# Altium PCB NB2DSK01.PcbDoc (part 8 of 17)
Units mil, origin at the board's own origin, x right, y up, seen from the top; angles counter-clockwise.
Board outline 11815 x 6500.03 mil, 8 copper layers (Top Layer, MidLayer1, MidLayer2, GND, PWR, MidLayer3, MidLayer4, Bottom Layer), stack 74.62 mil thick; 798 components, 1002 nets, 3927 pads, 3182 vias.
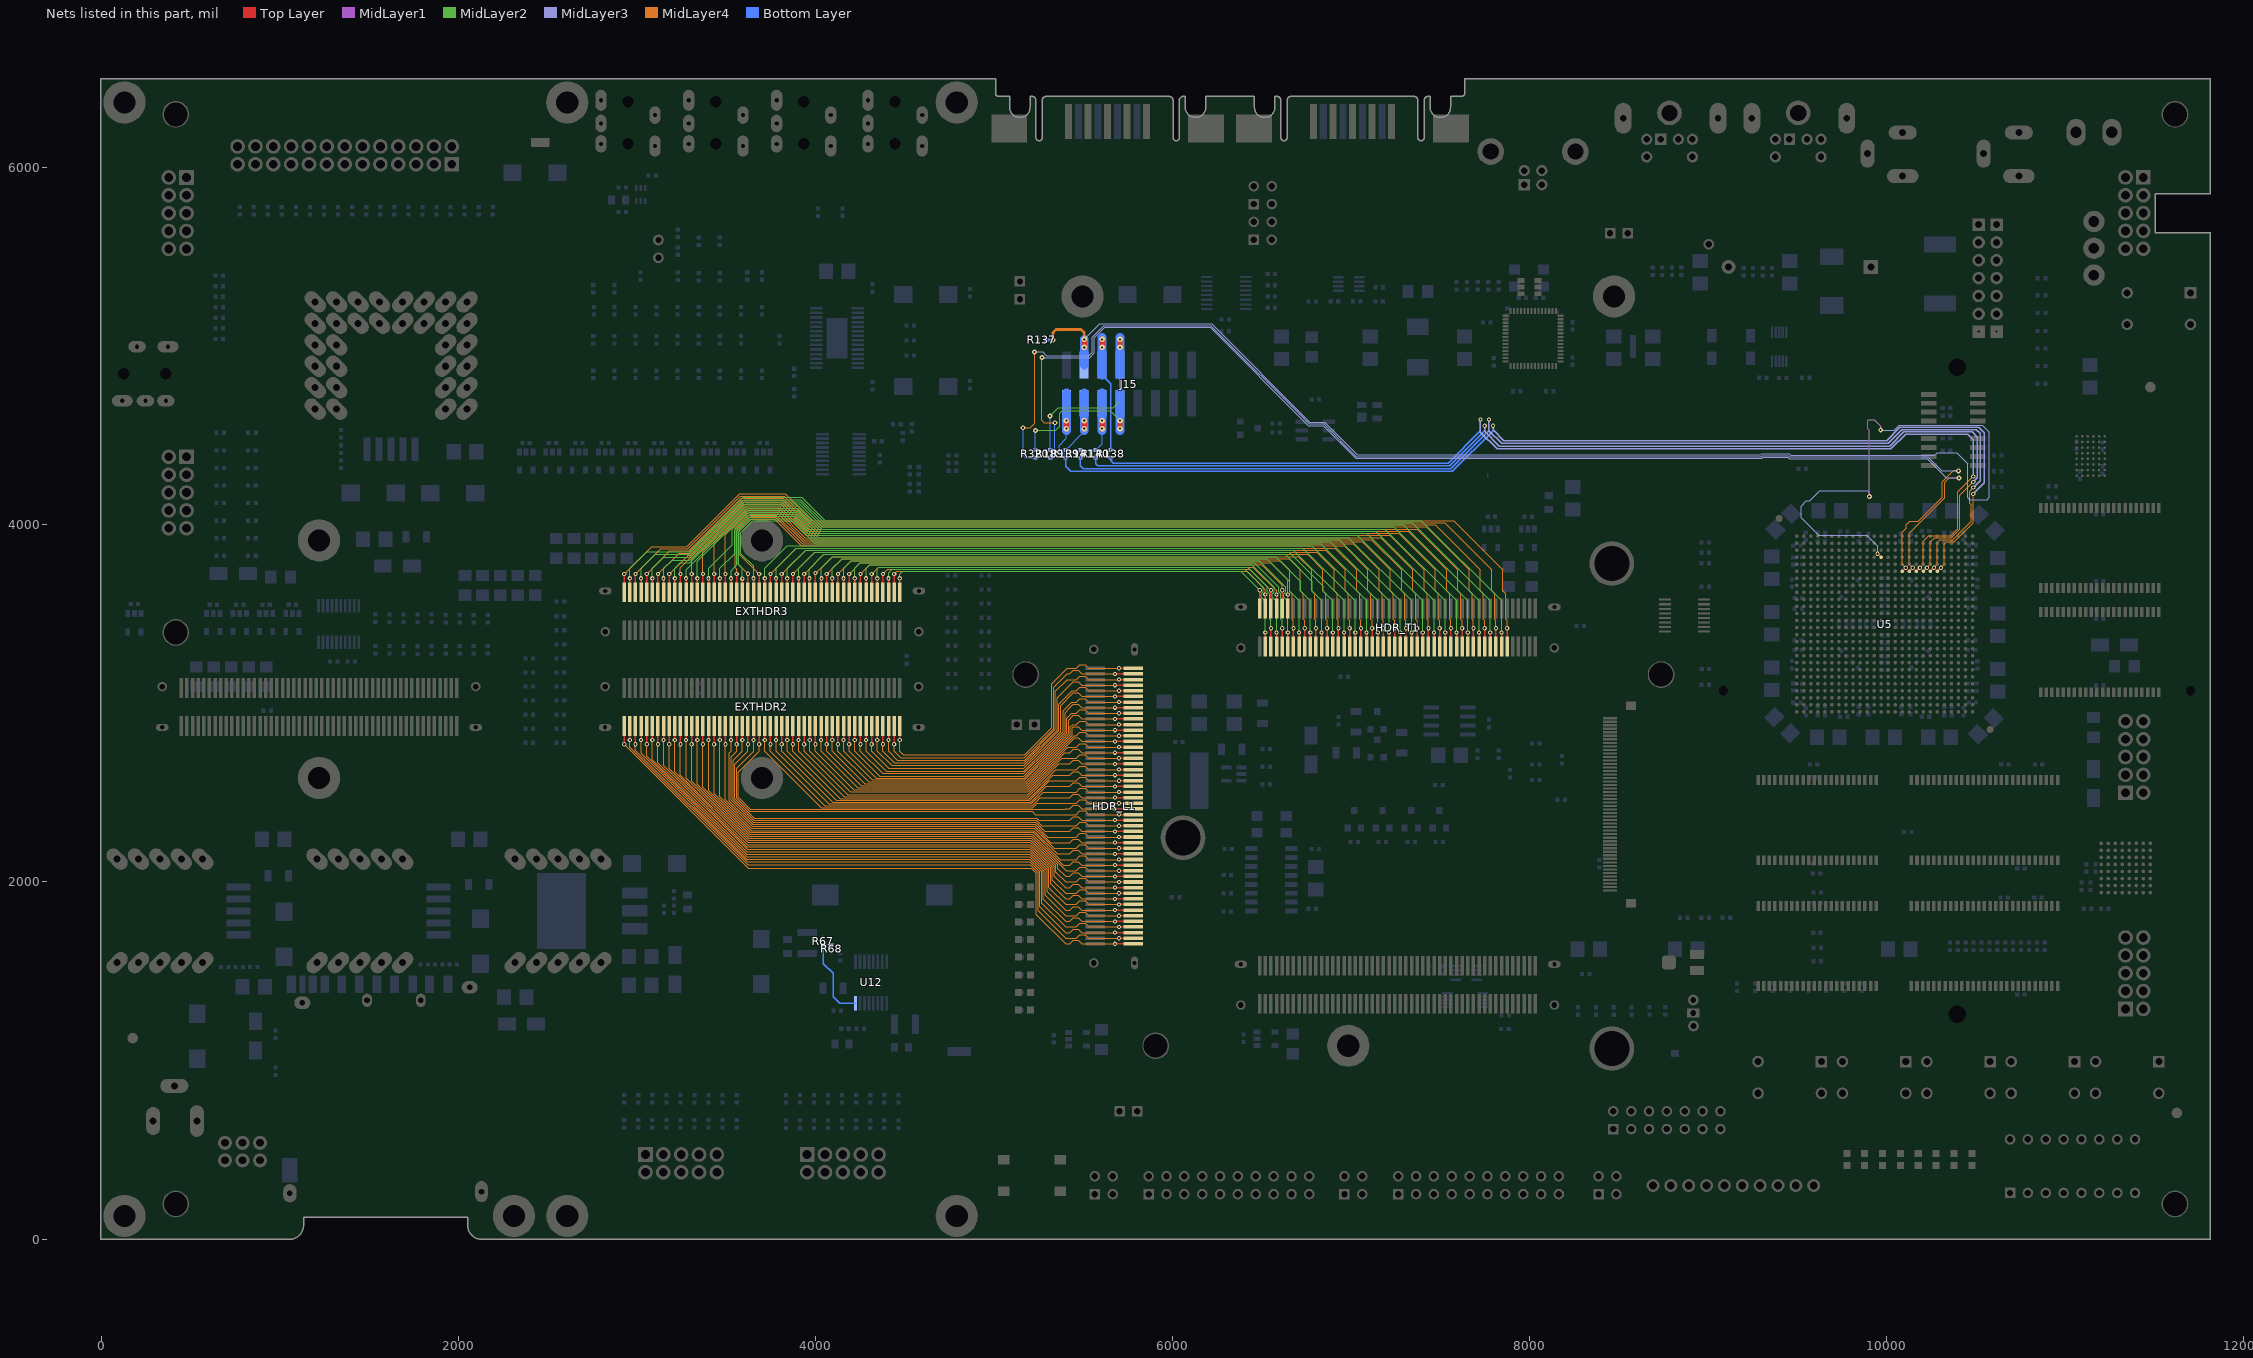
[diagram p14: the nets of this part, all layers, seen from the top]

## Via types
v1: diameter 23.62, hole 11.81, Top Layer to Bottom Layer, tented both sides, 1950 vias
v2: diameter 27.56, hole 11.81, Top Layer to Bottom Layer, tented both sides, 679 vias
v3: diameter 23.62, hole 11.81, Top Layer to Bottom Layer, 194 vias
v4: diameter 31.5, hole 11.81, Top Layer to Bottom Layer, tented both sides, 178 vias
v5: diameter 21.65, hole 11.81, Top Layer to Bottom Layer, tented both sides, 67 vias
v6: diameter 23.62, hole 11.81, Top Layer to Bottom Layer, tented bottom, 53 vias
v7: diameter 26, hole 11.81, Top Layer to Bottom Layer, tented both sides, 21 vias
v8: diameter 26, hole 11.81, Top Layer to Bottom Layer, 13 vias
v9: diameter 28, hole 11.81, Top Layer to Bottom Layer, 8 vias
v10: diameter 25.59, hole 11.81, Top Layer to Bottom Layer, tented both sides, 7 vias
v11: diameter 39.37, hole 11.81, Top Layer to Bottom Layer, tented both sides, 5 vias
v12: diameter 30, hole 11.81, Top Layer to Bottom Layer, 3 vias
v13: diameter 30, hole 11.81, Top Layer to Bottom Layer, tented both sides, 2 vias
v14: diameter 23, hole 11.81, Top Layer to Bottom Layer, tented both sides, 1 vias
v15: diameter 26.56, hole 11.81, Top Layer to Bottom Layer, tented both sides, 1 vias

## Nets (pads, with @x,y where several pads share a name; then routed paths per layer and width w, separated by ;. In a path a pad name is that pad's centre, name@x,y a point inside that pad or via, vN(x,y) a via of type N, cw(c..) or ccw(c..) an arc to the next point about the centre after c; other vN are vias at no path point) (continued)
EXT_B.D0: EXTHDR2.2 HDR_L1.2 | length 1820.1
  Top Layer w7.87: v1(4472.44,2795.28) EXTHDR2.2@4472.44,2874.02 ; v1(5700.79,3196.85) HDR_L1.2@5779.53,3196.85
  MidLayer4 w5: v1(4472.44,2795.28) 4472.44,2732.28 4493.27,2711.45 5172.08,2711.45 5323.67,2863.04 5323.67,3111.07 5409.45,3196.85 5460.63,3196.85 5480.32,3216.54 5511.81,3216.54 5531.5,3196.85 v1(5700.79,3196.85)
EXT_B.D1: EXTHDR2.4 HDR_L1.4 | length 1841.6
  Top Layer w7.87: v1(4440.95,2771.65) EXTHDR2.4@4440.95,2874.02 ; v1(5677.16,3165.36) HDR_L1.4@5779.53,3165.36
  MidLayer4 w5: v1(4440.95,2771.65) 4440.95,2732.28 4477.78,2695.45 5170.23,2695.45 5238.27,2763.5 5333.67,2858.89 5333.67,3089.57 5409.45,3165.35 5425.2,3165.35 5444.88,3185.04 5472.44,3185.04 5492.13,3165.36 v1(5677.16,3165.36)
EXT_B.D2: EXTHDR2.6 HDR_L1.6 | length 1860.7
  Top Layer w7.87: v1(4409.45,2795.28) EXTHDR2.6@4409.45,2874.02 ; v1(5700.79,3133.86) HDR_L1.6@5779.53,3133.86
  MidLayer4 w5: v1(4409.45,2795.28) 4409.45,2732.28 4459.28,2682.45 5171.37,2682.45 5343.67,2854.75 5343.67,3068.08 5409.45,3133.86 5460.63,3133.86 5480.32,3153.54 5511.81,3153.54 5531.5,3133.86 v1(5700.79,3133.86)
EXT_B.D3: EXTHDR2.8 HDR_L1.8 | length 1872.2
  Top Layer w7.87: v1(4377.95,2771.65) EXTHDR2.8@4377.95,2874.02 ; v1(5677.16,3102.36) HDR_L1.8@5779.53,3102.36
  MidLayer4 w5: v1(4377.95,2771.65) 4377.95,2732.28 4442.78,2667.45 5170.51,2667.45 5353.67,2850.61 5353.67,3030.83 5425.2,3102.36 5444.88,3122.05 5472.44,3122.05 5492.13,3102.36 v1(5677.16,3102.36)
EXT_B.D4: EXTHDR2.10 HDR_L1.10 | length 1884.8
  Top Layer w7.87: v1(4346.46,2795.28) EXTHDR2.10@4346.46,2874.02 ; v1(5700.79,3070.87) HDR_L1.10@5779.53,3070.87
  MidLayer4 w5: v1(4346.46,2795.28) 4346.46,2732.28 4426.29,2652.45 5169.65,2652.45 5268.27,2751.07 5363.67,2846.47 5363.67,2995.53 5439,3070.87 5460.63,3070.87 5480.32,3090.55 5511.81,3090.55 5531.5,3070.87 v1(5700.79,3070.87)
EXT_B.D5: EXTHDR2.12 HDR_L1.12 | length 1914.4
  Top Layer w7.87: v1(4314.96,2771.65) EXTHDR2.12@4314.96,2874.02 ; v1(5677.16,3039.37) HDR_L1.12@5779.53,3039.37
  MidLayer4 w5: v1(4314.96,2771.65) 4314.96,2732.28 4410.79,2636.45 5167.79,2636.45 5373.67,2842.33 5373.67,2987.84 5444.88,3059.06 5472.44,3059.06 5492.13,3039.37 v1(5677.16,3039.37)
EXT_B.D6: EXTHDR2.14 HDR_L1.14 | length 1929.6
  Top Layer w7.87: v1(4283.47,2795.28) EXTHDR2.14@4283.47,2874.02 ; v1(5700.79,3007.88) HDR_L1.14@5779.53,3007.88
  MidLayer4 w5: v1(4283.47,2795.28) 4283.47,2732.28 4395.3,2620.45 5165.94,2620.45 5387.81,2842.33 5387.81,2959.68 5436,3007.88 5460.63,3007.88 5480.32,3027.56 5511.81,3027.56 5531.5,3007.88 v1(5700.79,3007.88)
EXT_B.D7: EXTHDR2.16 HDR_L1.16 | length 1954.2
  Top Layer w7.87: v1(4251.97,2771.65) EXTHDR2.16@4251.97,2874.02 ; v1(5677.16,2976.38) HDR_L1.16@5779.53,2976.38
  MidLayer4 w5: v1(4251.97,2771.65) 4251.97,2732.28 4375.8,2608.45 5168.08,2608.45 5298.27,2738.64 5397.81,2838.18 5397.81,2948.99 5425.2,2976.38 5444.88,2996.06 5472.44,2996.06 5492.13,2976.38 v1(5677.16,2976.38)
EXT_B.D8: EXTHDR2.18 HDR_L1.18 | length 1969.2
  Top Layer w7.87: v1(4220.47,2795.28) EXTHDR2.18@4220.47,2874.02 ; v1(5700.79,2944.88) HDR_L1.18@5779.53,2944.88
  MidLayer4 w5: v1(4220.47,2795.28) 4220.47,2732.28 4359.3,2593.45 5167.22,2593.45 5407.81,2834.04 5407.81,2917.69 5435,2944.88 5460.63,2944.88 5480.32,2964.57 5511.81,2964.57 5531.5,2944.88 v1(5700.79,2944.88)
EXT_B.D9: EXTHDR2.20 HDR_L1.20 | length 1993.1
  Top Layer w7.87: v1(4188.98,2771.65) EXTHDR2.20@4188.98,2874.02 ; v1(5677.16,2913.39) HDR_L1.20@5779.53,2913.39
  MidLayer4 w5: v1(4188.98,2771.65) 4188.98,2732.28 4339.81,2581.45 5169.36,2581.45 5417.81,2829.9 5417.81,2906 5444.88,2933.07 5472.44,2933.07 5492.13,2913.39 v1(5677.16,2913.39)
EXT_B.D10: EXTHDR2.22 HDR_L1.22 | length 2000.4
  Top Layer w7.87: v1(4157.48,2795.28) EXTHDR2.22@4157.48,2874.02 ; v1(5700.79,2881.89) HDR_L1.22@5779.53,2881.89
  MidLayer4 w5: v1(4157.48,2795.28) 4157.48,2732.28 4318.31,2571.45 5173.51,2571.45 5328.27,2726.22 5427.81,2825.76 5427.81,2868.7 5441,2881.89 5460.63,2881.89 5480.32,2901.58 5511.81,2901.58 5531.5,2881.89 v1(5700.79,2881.89)
EXT_B.D11: EXTHDR2.24 HDR_L1.24 | length 2027.1
  Top Layer w7.87: v1(4125.99,2771.65) EXTHDR2.24@4125.98,2874.02 ; v1(5677.16,2850.4) HDR_L1.24@5779.53,2850.39
  MidLayer4 w5: v1(4125.99,2771.65) 4125.99,2732.28 4297.82,2560.45 5176.65,2560.45 5437.81,2821.62 5437.81,2863.01 5444.88,2870.08 5472.44,2870.08 5492.13,2850.4 v1(5677.16,2850.4)
EXT_B.D12: EXTHDR2.26 HDR_L1.26 | length 2030.4
  Top Layer w7.87: v1(4094.49,2795.28) EXTHDR2.26@4094.49,2874.02 ; v1(5700.79,2818.9) HDR_L1.26@5779.53,2818.9
  MidLayer4 w5: v1(4094.49,2795.28) 4094.49,2732.28 4277.32,2549.45 5179.79,2549.45 5348.27,2717.93 5449.23,2818.9 5460.63,2818.9 5480.32,2838.58 5511.81,2838.58 5531.5,2818.9 v1(5700.79,2818.9)
EXT_B.D13: EXTHDR2.28 HDR_L1.28 | length 2057.2
  Top Layer w7.87: v1(4062.99,2771.65) EXTHDR2.28@4062.99,2874.02 ; v1(5677.16,2787.4) HDR_L1.28@5779.53,2787.4
  MidLayer4 w5: v1(4062.99,2771.65) 4062.99,2732.28 4255.82,2539.45 5183.93,2539.45 5358.27,2713.79 ; 5358.27,2713.79 5451.57,2807.09 5472.44,2807.09 5492.13,2787.4 v1(5677.16,2787.4)
EXT_B.D14: EXTHDR2.30 HDR_L1.30 | length 2085.5
  Top Layer w7.87: v1(4031.5,2795.28) EXTHDR2.30@4031.5,2874.02 ; v1(5700.79,2755.91) HDR_L1.30@5779.53,2755.91
  MidLayer4 w5: v1(4031.5,2795.28) 4031.5,2732.28 4236.33,2527.45 5186.07,2527.45 5414.53,2755.91 5460.63,2755.91 5480.32,2775.59 5511.81,2775.59 5531.5,2755.91 v1(5700.79,2755.91)
EXT_B.D15: EXTHDR2.32 HDR_L1.32 | length 2113.1
  Top Layer w7.87: v1(4000,2771.65) EXTHDR2.32@4000,2874.02 ; v1(5677.16,2724.41) HDR_L1.32@5779.53,2724.41
  MidLayer4 w5: v1(4000,2771.65) 4000,2732.28 4215.83,2516.45 5189.22,2516.45 5397.17,2724.41 5425.2,2724.41 5444.88,2744.1 5472.44,2744.1 5492.13,2724.41 v1(5677.16,2724.41)
EXT_B.D16: EXTHDR2.34 HDR_L1.34 | length 2141.5
  Top Layer w7.87: v1(3968.51,2795.28) EXTHDR2.34@3968.5,2874.02 ; v1(5700.79,2692.91) HDR_L1.34@5779.53,2692.91
  MidLayer4 w5: v1(3968.51,2795.28) 3968.51,2732.28 4196.33,2504.45 5191.36,2504.45 5379.82,2692.91 5460.63,2692.91 5480.32,2712.6 5511.81,2712.6 5531.5,2692.91 v1(5700.79,2692.91)
EXT_B.D17: EXTHDR2.36 HDR_L1.36 | length 2174
  Top Layer w7.87: v1(3937.01,2771.65) EXTHDR2.36@3937.01,2874.02 ; v1(5677.16,2661.42) HDR_L1.36@5779.53,2661.42
  MidLayer4 w5: v1(3937.01,2771.65) 3937.01,2732.28 4181.81,2487.48 5188.53,2487.48 5362.47,2661.42 5425.2,2661.42 5444.88,2681.1 5472.44,2681.1 5492.13,2661.42 v1(5677.16,2661.42)
EXT_B.D18: EXTHDR2.38 HDR_L1.38 | length 2200.7
  Top Layer w7.87: v1(3905.51,2795.28) EXTHDR2.38@3905.51,2874.02 ; v1(5700.79,2629.92) HDR_L1.38@5779.53,2629.92
  MidLayer4 w5: v1(3905.51,2795.28) 3905.51,2732.28 4160.32,2477.48 5192.67,2477.48 5345.11,2629.92 5460.63,2629.92 5480.32,2649.61 5511.81,2649.61 5531.5,2629.92 v1(5700.79,2629.92)
EXT_B.D19: EXTHDR2.40 HDR_L1.40 | length 2227.5
  Top Layer w7.87: v1(3874.02,2771.65) EXTHDR2.40@3874.02,2874.02 ; v1(5677.16,2598.43) HDR_L1.40@5779.53,2598.43
  MidLayer4 w5: v1(3874.02,2771.65) 3874.02,2732.28 4138.82,2467.48 5196.81,2467.48 5327.76,2598.43 5425.2,2598.43 5444.88,2618.11 5472.44,2618.11 5492.13,2598.43 v1(5677.16,2598.43)
EXT_B.D20: EXTHDR2.42 HDR_L1.42 | length 2254.2
  Top Layer w7.87: v1(3842.52,2795.28) EXTHDR2.42@3842.52,2874.02 ; v1(5700.79,2566.93) HDR_L1.42@5779.53,2566.93
  MidLayer4 w5: v1(3842.52,2795.28) 3842.52,2732.28 4117.32,2457.48 5200.95,2457.48 5310.4,2566.93 5460.63,2566.93 5480.32,2586.61 5511.81,2586.61 5531.5,2566.93 v1(5700.79,2566.93)
EXT_B.D21: EXTHDR2.44 HDR_L1.44 | length 2280.9
  Top Layer w7.87: v1(3811.02,2771.65) EXTHDR2.44@3811.02,2874.02 ; v1(5677.16,2535.43) HDR_L1.44@5779.53,2535.43
  MidLayer4 w5: v1(3811.02,2771.65) 3811.02,2732.28 4095.83,2447.48 5205.1,2447.48 5293.05,2535.43 5425.2,2535.43 5444.88,2555.12 5472.44,2555.12 5492.13,2535.43 v1(5677.16,2535.43)
EXT_B.D22: EXTHDR2.46 HDR_L1.46 | length 2307.7
  Top Layer w7.87: v1(3779.53,2795.28) EXTHDR2.46@3779.53,2874.02 ; v1(5700.79,2503.94) HDR_L1.46@5779.53,2503.94
  MidLayer4 w5: v1(3779.53,2795.28) 3779.53,2732.28 4074.33,2437.48 5209.24,2437.48 5275.7,2503.94 5460.63,2503.94 5480.32,2523.62 5511.81,2523.62 5531.5,2503.94 v1(5700.79,2503.94)
EXT_B.D23: EXTHDR2.48 HDR_L1.48 | length 2334.4
  Top Layer w7.87: v1(3748.03,2771.65) EXTHDR2.48@3748.03,2874.02 ; v1(5677.16,2472.44) HDR_L1.48@5779.53,2472.44
  MidLayer4 w5: v1(3748.03,2771.65) 3748.03,2732.28 4052.83,2427.48 5213.38,2427.48 5258.34,2472.44 5425.2,2472.44 5444.88,2492.13 5472.44,2492.13 5492.13,2472.44 v1(5677.16,2472.44)
EXT_B.D24: EXTHDR2.50 HDR_L1.50 | length 2361.6
  Top Layer w7.87: v1(3716.54,2795.28) EXTHDR2.50@3716.54,2874.02 ; v1(5700.79,2440.95) HDR_L1.50@5779.53,2440.95
  MidLayer4 w5: v1(3716.54,2795.28) 3716.54,2732.28 4031.89,2416.93 5216.97,2416.93 5240.99,2440.95 5460.63,2440.95 5480.32,2460.63 5511.81,2460.63 5531.5,2440.95 v1(5700.79,2440.95)
EXT_B.D25: EXTHDR2.52 HDR_L1.52 | length 2704.6
  Top Layer w7.87: v1(3685.04,2771.65) EXTHDR2.52@3685.04,2874.02 ; v1(5677.16,2409.45) HDR_L1.52@5779.53,2409.45
  MidLayer4 w5: v1(3685.04,2771.65) 3685.04,2732.28 3568.74,2615.98 3568.74,2473.69 3635.81,2406.62 5398.74,2406.62 5401.58,2409.45 5425.2,2409.45 5444.88,2429.13 5472.44,2429.13 5492.13,2409.45 v1(5677.16,2409.45)
EXT_B.D26: EXTHDR2.54 HDR_L1.54 | length 2718.8
  Top Layer w7.87: v1(3653.54,2795.28) EXTHDR2.54@3653.54,2874.02 ; v1(5700.79,2377.95) HDR_L1.54@5779.53,2377.95
  MidLayer4 w5: v1(3653.54,2795.28) 3653.54,2732.28 3558.74,2637.48 3558.74,2469.55 3631.67,2396.61 5213.62,2396.61 5232.28,2377.95 5460.63,2377.95 5480.32,2397.64 5511.81,2397.64 5531.5,2377.95 v1(5700.79,2377.95)
EXT_B.D27: EXTHDR2.56 HDR_L1.56 | length 2735.3
  Top Layer w7.87: v1(3622.05,2771.65) EXTHDR2.56@3622.05,2874.02 ; v1(5677.16,2346.46) HDR_L1.56@5779.53,2346.46
  MidLayer4 w5: v1(3622.05,2771.65) 3622.05,2732.28 3548.74,2658.98 3548.74,2465.4 3656.98,2357.16 5238.93,2357.16 5249.64,2346.46 5425.2,2346.46 5444.88,2366.14 5472.44,2366.14 5492.13,2346.46 v1(5677.16,2346.46)
EXT_B.D28: EXTHDR2.58 HDR_L1.58 | length 2751.9
  Top Layer w7.87: v1(3590.55,2795.28) EXTHDR2.58@3590.55,2874.02 ; v1(5700.79,2314.96) HDR_L1.58@5779.53,2314.96
  MidLayer4 w5: v1(3590.55,2795.28) 3590.55,2732.28 3538.74,2680.47 3538.74,2461.26 3655.55,2344.45 5237.5,2344.45 5266.99,2314.96 5460.63,2314.96 5480.32,2334.65 5511.81,2334.65 5531.5,2314.96 v1(5700.79,2314.96)
EXT_B.D29: EXTHDR2.60 HDR_L1.60 | length 2768.5
  Top Layer w7.87: v1(3559.06,2771.65) EXTHDR2.60@3559.06,2874.02 ; v1(5677.16,2283.47) HDR_L1.60@5779.53,2283.47
  MidLayer4 w5: v1(3559.06,2771.65) 3559.06,2732.28 3528.74,2701.97 3528.74,2457.12 3652.4,2333.45 5234.36,2333.45 5284.35,2283.47 5425.2,2283.47 5444.88,2303.15 5472.44,2303.15 5492.13,2283.47 v1(5677.16,2283.47)
EXT_B.D30: EXTHDR2.62 HDR_L1.62 | length 2785
  Top Layer w7.09: v1(3527.56,2795.28) EXTHDR2.62@3527.56,2874.02 ; v1(5700.79,2251.97) HDR_L1.62@5779.53,2251.97
  MidLayer4 w5: v1(3527.56,2795.28) 3527.56,2732.28 3518.74,2723.46 3518.74,2452.98 3649.26,2322.45 5231.22,2322.45 5301.7,2251.97 5460.63,2251.97 5480.32,2271.65 5511.81,2271.65 5531.5,2251.97 v1(5700.79,2251.97)
EXT_B.D31: EXTHDR2.64 HDR_L1.64 | length 2812.1
  Top Layer w7.09: v1(3496.06,2771.65) EXTHDR2.64@3496.06,2874.02 ; v1(5677.16,2220.47) HDR_L1.64@5779.53,2220.47
  MidLayer4 w5: v1(3496.06,2771.65) 3496.06,2461.51 3645.12,2312.45 5227.07,2312.45 5319.05,2220.47 5425.2,2220.47 5444.88,2240.16 5472.44,2240.16 5492.13,2220.47 v1(5677.16,2220.47)
EXT_B.D32: EXTHDR2.66 HDR_L1.66 | length 2847.4
  Top Layer w7.09: v1(3464.57,2795.28) EXTHDR2.66@3464.57,2874.02 ; v1(5700.79,2188.98) HDR_L1.66@5779.53,2188.98
  MidLayer4 w5: v1(3464.57,2795.28) 3464.57,2477.26 3641.37,2300.45 5224.93,2300.45 5336.41,2188.98 5460.63,2188.98 5480.32,2208.66 5511.81,2208.66 5531.5,2188.98 v1(5700.79,2188.98)
EXT_B.D33: EXTHDR2.68 HDR_L1.68 | length 2881.8
  Top Layer w7.09: v1(3433.07,2771.65) EXTHDR2.68@3433.07,2874.02 ; v1(5677.16,2157.48) HDR_L1.68@5779.53,2157.48
  MidLayer4 w5: v1(3433.07,2771.65) 3433.07,2494.61 3639.52,2288.16 5223.08,2288.16 5353.76,2157.48 5425.2,2157.48 5444.88,2177.17 5472.44,2177.17 5492.13,2157.48 v1(5677.16,2157.48)
EXT_B.D34: EXTHDR2.70 HDR_L1.70 | length 2916.2
  Top Layer w7.09: v1(3401.58,2795.28) EXTHDR2.70@3401.57,2874.02 ; v1(5700.79,2125.99) HDR_L1.70@5779.53,2125.98
  MidLayer4 w5: v1(3401.58,2795.28) 3401.58,2511.97 3635.84,2277.71 5219.39,2277.71 5371.12,2125.99 5460.63,2125.99 5480.32,2145.67 5511.81,2145.67 5531.5,2125.99 v1(5700.79,2125.99)
EXT_B.D35: EXTHDR2.72 HDR_L1.72 | length 2950.6
  Top Layer w7.09: v1(3370.08,2771.65) EXTHDR2.72@3370.08,2874.02 ; v1(5677.16,2094.49) HDR_L1.72@5779.53,2094.49
  MidLayer4 w5: v1(3370.08,2771.65) 3370.08,2529.32 3631.94,2267.45 5215.5,2267.45 5388.47,2094.49 5425.2,2094.49 5444.88,2114.17 5472.44,2114.17 5492.13,2094.49 v1(5677.16,2094.49)
EXT_B.D36: EXTHDR2.74 HDR_L1.74 | length 2984.9
  Top Layer w7.09: v1(3338.58,2795.28) EXTHDR2.74@3338.58,2874.02 ; v1(5700.79,2062.99) HDR_L1.74@5779.53,2062.99
  MidLayer4 w5: v1(3338.58,2795.28) 3338.58,2546.67 3628.8,2256.45 5212.36,2256.45 5405.82,2062.99 5460.63,2062.99 5480.32,2082.68 5511.81,2082.68 5531.5,2062.99 v1(5700.79,2062.99)
EXT_B.D37: EXTHDR2.76 HDR_L1.76 | length 3032.5
  Top Layer w7.09: v1(3307.09,2771.65) EXTHDR2.76@3307.09,2874.02 ; v1(5677.16,2031.5) HDR_L1.76@5779.53,2031.5
  MidLayer4 w5: v1(3307.09,2771.65) 3307.09,2564.03 3625.66,2245.45 5209.22,2245.45 5357.13,2097.55 5357.13,2075.12 5400.75,2031.5 5425.2,2031.5 5444.88,2051.18 5472.44,2051.18 5492.13,2031.5 v1(5677.16,2031.5)
EXT_B.D38: EXTHDR2.78 HDR_L1.78 | length 3077
  Top Layer w7.09: v1(3275.59,2795.28) EXTHDR2.78@3275.59,2874.02 ; v1(5700.79,2000) HDR_L1.78@5779.53,2000
  MidLayer4 w5: v1(3275.59,2795.28) 3275.59,2581.38 3622.52,2234.45 5206.08,2234.45 5347.13,2093.41 5347.13,2053.62 5400.75,2000 5460.63,2000 5480.32,2019.69 5511.81,2019.69 5531.5,2000 v1(5700.79,2000)
EXT_B.D39: EXTHDR2.80 HDR_L1.80 | length 3121.5
  Top Layer w7.09: v1(3244.1,2771.65) EXTHDR2.80@3244.09,2874.02 ; v1(5677.16,1968.51) HDR_L1.80@5779.53,1968.5
  MidLayer4 w5: v1(3244.1,2771.65) 3244.09,2598.74 3620.38,2222.45 5203.94,2222.45 5337.13,2089.27 5337.13,2032.13 5400.75,1968.51 5425.2,1968.51 5444.88,1988.19 5472.44,1988.19 5492.13,1968.51 v1(5677.16,1968.51)
EXT_B.D40: EXTHDR2.82 HDR_L1.82 | length 3166.1
  Top Layer w7.09: v1(3212.6,2795.28) EXTHDR2.82@3212.6,2874.02 ; v1(5700.79,1937.01) HDR_L1.82@5779.53,1937.01
  MidLayer4 w5: v1(3212.6,2795.28) 3212.6,2616.09 3619.24,2209.45 5202.8,2209.45 5327.13,2085.12 5327.13,2010.63 5400.75,1937.01 5460.63,1937.01 5480.32,1956.69 5511.81,1956.69 5531.5,1937.01 v1(5700.79,1937.01)
EXT_B.D41: EXTHDR2.84 HDR_L1.84 | length 3210.6
  Top Layer w7.09: v1(3181.1,2771.65) EXTHDR2.84@3181.1,2874.02 ; v1(5677.16,1905.51) HDR_L1.84@5779.53,1905.51
  MidLayer4 w5: v1(3181.1,2771.65) 3181.1,2633.44 3616.09,2198.45 5199.65,2198.45 5317.13,2080.98 5317.13,1989.13 5400.75,1905.51 5425.2,1905.51 5444.88,1925.2 5472.44,1925.2 5492.13,1905.51 v1(5677.16,1905.51)
EXT_B.D42: EXTHDR2.86 HDR_L1.86 | length 3255.2
  Top Layer w7.09: v1(3149.61,2795.28) EXTHDR2.86@3149.61,2874.02 ; v1(5700.79,1874.02) HDR_L1.86@5779.53,1874.02
  MidLayer4 w5: v1(3149.61,2795.28) 3149.61,2650.8 3616.95,2183.45 5200.51,2183.45 5307.13,2076.84 5307.13,1967.64 5400.75,1874.02 5460.63,1874.02 5480.32,1893.7 5511.81,1893.7 5531.5,1874.02 v1(5700.79,1874.02)
EXT_B.D43: EXTHDR2.88 HDR_L1.88 | length 3299.7
  Top Layer w7.09: v1(3118.11,2771.65) EXTHDR2.88@3118.11,2874.02 ; v1(5677.16,1842.52) HDR_L1.88@5779.53,1842.52
  MidLayer4 w5: v1(3118.11,2771.65) 3118.11,2668.15 3615.81,2170.45 5199.37,2170.45 5297.13,2072.7 5297.13,1946.14 5400.75,1842.52 5425.2,1842.52 5444.88,1862.2 5472.44,1862.2 5492.13,1842.52 v1(5677.16,1842.52)
EXT_B.D44: EXTHDR2.90 HDR_L1.90 | length 3344.3
  Top Layer w7.87: v1(3086.61,2795.28) EXTHDR2.90@3086.61,2874.02 ; v1(5700.79,1811.02) HDR_L1.90@5779.53,1811.02
  MidLayer4 w5: v1(3086.61,2795.28) 3086.61,2685.51 3615.67,2156.45 5199.23,2156.45 5287.13,2068.55 5287.13,1924.65 5400.75,1811.02 5460.63,1811.02 5480.32,1830.71 5511.81,1830.71 5531.5,1811.02 v1(5700.79,1811.02)
EXT_B.D45: EXTHDR2.92 HDR_L1.92 | length 3388.8
  Top Layer w7.87: v1(3055.12,2771.65) EXTHDR2.92@3055.12,2874.02 ; v1(5677.16,1779.53) HDR_L1.92@5779.53,1779.53
  MidLayer4 w5: v1(3055.12,2771.65) 3055.12,2702.86 3616.52,2141.45 5200.08,2141.45 5277.13,2064.41 5277.13,1903.15 5400.75,1779.53 5425.2,1779.53 5444.88,1799.21 5472.44,1799.21 5492.13,1779.53 v1(5677.16,1779.53)
EXT_B.D46: EXTHDR2.94 HDR_L1.94 | length 3433.3
  Top Layer w7.87: v1(3023.62,2795.28) EXTHDR2.94@3023.62,2874.02 ; v1(5700.79,1748.03) HDR_L1.94@5779.53,1748.03
  MidLayer4 w5: v1(3023.62,2795.28) 3023.62,2720.22 3615.38,2128.45 5198.94,2128.45 5267.13,2060.27 5267.13,1881.65 5400.75,1748.03 5460.63,1748.03 5480.32,1767.72 5511.81,1767.72 5531.5,1748.03 v1(5700.79,1748.03)
EXT_B.D47: EXTHDR2.96 HDR_L1.96 | length 3477.9
  Top Layer w7.87: v1(2992.13,2771.65) EXTHDR2.96@2992.13,2874.02 ; v1(5677.16,1716.54) HDR_L1.96@5779.53,1716.54
  MidLayer4 w5: v1(2992.13,2771.65) 2992.12,2737.57 3617.24,2112.45 5200.8,2112.45 5257.13,2056.13 5257.13,1860.16 5400.75,1716.54 5425.2,1716.54 5444.88,1736.22 5472.44,1736.22 5492.13,1716.54 v1(5677.16,1716.54)
EXT_B.D48: EXTHDR2.98 HDR_L1.98 | length 3522.4
  Top Layer w7.87: v1(2960.63,2795.28) EXTHDR2.98@2960.63,2874.02 ; v1(5700.79,1685.04) HDR_L1.98@5779.53,1685.04
  MidLayer4 w5: v1(2960.63,2795.28) 2960.63,2754.92 3620.1,2095.45 5203.66,2095.45 5247.13,2051.99 5247.13,1838.66 5400.75,1685.04 5460.63,1685.04 5480.32,1704.72 5511.81,1704.72 5531.5,1685.04 v1(5700.79,1685.04)
EXT_B.D49: EXTHDR2.100 HDR_L1.100 | length 3568.2
  Top Layer w7.87: v1(2929.13,2771.65) EXTHDR2.100@2929.13,2874.02 ; v1(5677.16,1653.54) HDR_L1.100@5779.53,1653.54
  MidLayer4 w5: v1(2929.13,2771.65) 2929.13,2772.28 2929.44,2771.97 3624.96,2076.45 5208.52,2076.45 5237.13,2047.84 5237.13,1817.17 5400.75,1653.54 5425.2,1653.54 5444.88,1673.23 5472.44,1673.23 5492.13,1653.54 v1(5677.16,1653.54)
EXT_C.D0: EXTHDR3.2 HDR_T1.89 | length 5824.6
  Top Layer w7.87: EXTHDR3.2@2929.13,3622.05 v1(2929.13,3724.41) ; HDR_T1.89@7874.02,3318.9 v1(7874.02,3421.26)
  MidLayer4 w5: v1(2929.13,3724.41) 3082.68,3877.95 3279.87,3877.95 3326.1,3924.18 3441.97,4040.05 3575.15,4173.23 3830.36,4173.23 3979.97,4023.62 4590.55,4023.62 7574.8,4023.62 7850.4,3748.03 7850.4,3629.92 7866.14,3614.17 7866.14,3472.44 7874.02,3464.57 v1(7874.02,3421.26)
EXT_C.D1: EXTHDR3.4 HDR_T1.87 | length 5676.1
  Top Layer w7.87: EXTHDR3.4@2960.63,3622.05 v1(2960.63,3700.79) ; HDR_T1.87@7842.52,3318.9 v1(7842.52,3397.64)
  MidLayer2 w5: v1(2960.63,3700.79) 2960.63,3755.91 3055.12,3850.39 3292.64,3850.39 3595.79,4153.54 3923.89,4153.54 4053.81,4023.62 7393.7,4023.62 7842.52,3574.8 v1(7842.52,3397.64)
EXT_C.D2: EXTHDR3.6 HDR_T1.85 | length 5688.8
  Top Layer w7.87: EXTHDR3.6@2992.13,3622.05 v1(2992.12,3724.41) ; HDR_T1.85@7811.02,3318.9 v1(7811.02,3421.26)
  MidLayer4 w5: v1(2992.12,3724.41) 3133.86,3866.14 3284.77,3866.14 3580.04,4161.42 3825.47,4161.42 3975.08,4011.81 7523.62,4011.81 7787.4,3748.03 7787.4,3629.92 7803.15,3614.17 7803.15,3472.44 7811.03,3464.57 v1(7811.02,3421.26)
EXT_C.D3: EXTHDR3.8 HDR_T1.83 | length 5540.3
  Top Layer w7.87: EXTHDR3.8@3023.62,3622.05 v1(3023.62,3700.79) ; HDR_T1.83@7779.53,3318.9 v1(7779.53,3397.64)
  MidLayer2 w5: v1(3023.62,3700.79) 3023.62,3755.91 3102.36,3834.65 3293.6,3834.65 3600.68,4141.73 3919,4141.73 4048.92,4011.81 7342.52,4011.81 7779.53,3574.8 v1(7779.53,3397.64)
EXT_C.D4: EXTHDR3.10 HDR_T1.81 | length 5553
  Top Layer w7.87: EXTHDR3.10@3055.12,3622.05 v1(3055.12,3724.41) ; HDR_T1.81@7748.03,3318.9 v1(7748.03,3421.26)
  MidLayer4 w5: v1(3055.12,3724.41) 3185.04,3854.33 3289.66,3854.33 3584.94,4149.61 3820.58,4149.61 3970.18,4000 6196.85,4000 7472.44,4000 7724.41,3748.03 7724.41,3629.92 7740.16,3614.17 7740.16,3472.44 7748.03,3464.57 v1(7748.03,3421.26)
EXT_C.D5: EXTHDR3.12 HDR_T1.79 | length 5404.5
  Top Layer w7.87: EXTHDR3.12@3086.61,3622.05 v1(3086.61,3700.79) ; HDR_T1.79@7716.54,3318.9 v1(7716.54,3397.64)
  MidLayer2 w5: v1(3086.61,3700.79) 3086.61,3755.91 3149.61,3818.9 3294.55,3818.9 3605.58,4129.92 3914.11,4129.92 4044.03,4000 7291.34,4000 7716.54,3574.8 v1(7716.54,3397.64)
EXT_C.D6: EXTHDR3.14 HDR_T1.77 | length 5417.3
  Top Layer w7.09: EXTHDR3.14@3118.11,3622.05 v1(3118.11,3724.41)
  Top Layer w7.87: HDR_T1.77@7685.04,3318.9 v1(7685.04,3421.26)
  MidLayer4 w5: v1(3118.11,3724.41) 3236.22,3842.52 3294.55,3842.52 3589.83,4137.8 3815.68,4137.8 3965.29,3988.19 4590.55,3988.19 7421.26,3988.19 7661.42,3748.03 7661.42,3629.92 7677.17,3614.17 7677.17,3472.44 7685.04,3464.57 v1(7685.04,3421.26)
EXT_C.D7: EXTHDR3.16 HDR_T1.75 | length 5268.8
  Top Layer w7.09: EXTHDR3.16@3149.61,3622.05 v1(3149.6,3700.79)
  Top Layer w7.87: HDR_T1.75@7653.54,3318.9 v1(7653.55,3397.64)
  MidLayer2 w5: v1(3149.6,3700.79) 3149.61,3755.91 3196.85,3803.15 3295.51,3803.15 3610.47,4118.11 3909.22,4118.11 4039.14,3988.19 7240.16,3988.19 7653.55,3574.8 v1(7653.55,3397.64)
EXT_C.D8: EXTHDR3.18 HDR_T1.73 | length 5289.4
  Top Layer w7.09: EXTHDR3.18@3181.1,3622.05 v1(3181.1,3724.41)
  Top Layer w7.87: HDR_T1.73@7622.05,3318.9 v1(7622.05,3421.26)
  MidLayer4 w5: v1(3181.1,3724.41) 3287.4,3830.71 3299.45,3830.71 3594.72,4125.98 3810.79,4125.98 3960.4,3976.38 6204.72,3976.38 ; 6196.85,3976.38 6204.72,3976.38 ; v1(7622.05,3421.26) 7622.05,3464.57 7614.18,3472.44 7614.18,3614.17 7598.43,3629.92 7598.43,3748.03 7370.08,3976.38 6204.72,3976.38
EXT_C.D9: EXTHDR3.20 HDR_T1.71 | length 5133
  Top Layer w7.09: EXTHDR3.20@3212.6,3622.05 v1(3212.6,3700.79)
  Top Layer w7.87: HDR_T1.71@7590.55,3318.9 v1(7590.55,3397.64)
  MidLayer2 w5: v1(3212.6,3700.79) 3212.6,3755.91 3244.1,3787.4 3296.46,3787.4 3508.52,3999.46 3615.36,4106.3 3904.32,4106.3 4034.25,3976.38 7188.98,3976.38 7590.55,3574.8 v1(7590.55,3397.64)
EXT_C.D10: EXTHDR3.22 HDR_T1.69 | length 5169.7
  Top Layer w7.09: EXTHDR3.22@3244.09,3622.05 v1(3244.09,3724.41)
  Top Layer w7.87: HDR_T1.69@7559.06,3318.9 v1(7559.06,3421.26)
  MidLayer4 w5: v1(3244.09,3724.41) 3244.09,3758.66 3599.61,4114.18 3805.9,4114.18 3955.51,3964.57 4590.55,3964.57 ; 4586.62,3964.57 7318.9,3964.57 7535.44,3748.03 7535.44,3629.92 7551.18,3614.17 7551.18,3472.44 7559.06,3464.57 v1(7559.06,3421.26)
EXT_C.D11: EXTHDR3.24 HDR_T1.67 | length 4993.7
  Top Layer w7.09: EXTHDR3.24@3275.59,3622.05 v1(3275.59,3700.79)
  Top Layer w7.87: HDR_T1.67@7527.56,3318.9 v1(7527.56,3397.64)
  MidLayer2 w5: v1(3275.59,3700.79) 3275.59,3749.83 3620.25,4094.49 3899.43,4094.49 4029.35,3964.57 7137.8,3964.57 7527.56,3574.8 v1(7527.56,3397.64)
EXT_C.D12: EXTHDR3.26 HDR_T1.65 | length 5065
  Top Layer w7.09: EXTHDR3.26@3307.09,3622.05 v1(3307.09,3724.41)
  Top Layer w7.87: HDR_T1.65@7496.06,3318.9 v1(7496.06,3421.26)
  MidLayer4 w5: v1(3307.09,3724.41) 3307.09,3804.94 3604.5,4102.36 3801.01,4102.36 3950.61,3952.76 6204.72,3952.76 ; 6196.85,3952.76 6204.72,3952.76 ; v1(7496.06,3421.26) 7496.07,3464.57 7488.19,3472.44 7488.19,3614.17 7472.44,3629.92 7472.44,3748.03 7267.72,3952.76 6204.72,3952.76
EXT_C.D13: EXTHDR3.28 HDR_T1.63 | length 4885
  Top Layer w7.09: EXTHDR3.28@3338.58,3622.05 v1(3338.58,3700.79)
  Top Layer w7.87: HDR_T1.63@7464.57,3318.9 v1(7464.57,3397.64)
  MidLayer2 w5: v1(3338.58,3700.79) 3338.58,3796.12 3625.15,4082.68 3894.54,4082.68 4024.46,3952.76 7086.61,3952.76 7464.57,3574.8 v1(7464.57,3397.64)
EXT_C.D14: EXTHDR3.30 HDR_T1.61 | length 4952.4
  Top Layer w7.09: EXTHDR3.30@3370.08,3622.05 v1(3370.08,3724.41)
  Top Layer w7.87: HDR_T1.61@7433.07,3318.9 v1(7433.07,3421.26)
  MidLayer4 w5: v1(3370.08,3724.41) 3370.08,3851.23 3538.8,4019.96 3609.4,4090.55 3796.12,4090.55 3945.72,3940.95 4586.61,3940.95 ; 4590.55,3940.95 4586.61,3940.95 ; v1(7433.07,3421.26) 7433.07,3464.57 7425.2,3472.44 7425.2,3614.17 7409.45,3629.92 7409.45,3748.03 7216.53,3940.95 4586.62,3940.95
EXT_C.D15: EXTHDR3.32 HDR_T1.59 | length 4776.4
  Top Layer w7.09: EXTHDR3.32@3401.57,3622.05 v1(3401.57,3700.79)
  Top Layer w7.87: HDR_T1.59@7401.58,3318.9 v1(7401.58,3397.64)
  MidLayer2 w5: v1(3401.57,3700.79) 3401.58,3755.91 3535.43,3889.76 3535.43,3976.26 3630.04,4070.87 3889.65,4070.87 4019.57,3940.95 7035.43,3940.95 7401.58,3574.8 v1(7401.58,3397.64)
EXT_C.D16: EXTHDR3.34 HDR_T1.57 | length 4839.8
  Top Layer w7.09: EXTHDR3.34@3433.07,3622.05 v1(3433.07,3724.41)
  Top Layer w7.87: HDR_T1.57@7370.08,3318.9 v1(7370.08,3421.26)
  MidLayer4 w5: v1(3433.07,3724.41) 3433.07,3897.52 3542.23,4006.68 3614.29,4078.74 3791.22,4078.74 3940.83,3929.13 6196.85,3929.14 7165.35,3929.13 7346.46,3748.03 7346.46,3629.92 7362.21,3614.17 7362.21,3472.44 7370.08,3464.57 v1(7370.08,3421.26)
EXT_C.D17: EXTHDR3.36 HDR_T1.55 | length 4667.7
  Top Layer w7.09: EXTHDR3.36@3464.57,3622.05 v1(3464.57,3700.79)
  Top Layer w7.87: HDR_T1.55@7338.58,3318.9 v1(7338.58,3397.64)
  MidLayer2 w5: v1(3464.57,3700.79) 3464.57,3755.91 3547.24,3838.58 3547.24,3971.37 3634.93,4059.06 3884.76,4059.06 4014.68,3929.13 6984.25,3929.13 7338.58,3574.8 v1(7338.58,3397.64)
EXT_C.D18: EXTHDR3.38 HDR_T1.53 | length 4731.2
  Top Layer w7.09: EXTHDR3.38@3496.06,3622.05 v1(3496.06,3724.41)
  Top Layer w7.87: HDR_T1.53@7307.09,3318.9 v1(7307.09,3421.26)
  MidLayer4 w5: v1(3496.06,3724.41) 3496.06,3943.81 3619.18,4066.93 3786.33,4066.93 3935.94,3917.32 4590.55,3917.33 7114.17,3917.32 7283.47,3748.03 7283.47,3629.92 7299.21,3614.17 7299.21,3472.44 7307.09,3464.57 v1(7307.09,3421.26)
EXT_C.D19: EXTHDR3.40 HDR_T1.51 | length 4559.1
  Top Layer w7.09: EXTHDR3.40@3527.56,3622.05 v1(3527.56,3700.79)
  Top Layer w7.87: HDR_T1.51@7275.59,3318.9 v1(7275.59,3397.64)
  MidLayer2 w5: v1(3527.56,3700.79) 3527.56,3744.1 3559.06,3775.59 3559.06,3966.48 3639.82,4047.24 3879.86,4047.24 4009.78,3917.32 6933.07,3917.32 7275.59,3574.8 v1(7275.59,3397.64)
EXT_C.D20: EXTHDR3.42 HDR_T1.49 | length 4629
  Top Layer w7.87: EXTHDR3.42@3559.06,3622.05 v1(3559.05,3724.41) ; HDR_T1.49@7244.09,3318.9 v1(7244.09,3421.26)
  MidLayer4 w5: v1(3559.05,3724.41) 3559.05,3751.97 3551.18,3759.84 3551.18,3982.23 3624.07,4055.12 3781.44,4055.12 3931.04,3905.51 6196.85,3905.51 7062.99,3905.51 7220.47,3748.03 7220.47,3629.92 7236.22,3614.17 7236.22,3472.44 7244.1,3464.57 v1(7244.09,3421.26)
EXT_C.D21: EXTHDR3.44 HDR_T1.47 | length 4464.8
  Top Layer w7.87: EXTHDR3.44@3590.55,3622.05 v1(3590.55,3698.82) ; HDR_T1.47@7212.6,3318.9 v1(7212.6,3397.64)
  MidLayer2 w5: v1@3590.55,3700.79 3590.55,3755.91 3570.87,3775.59 3570.87,3961.59 3644.71,4035.43 3874.97,4035.43 4004.89,3905.51 6881.89,3905.51 7212.6,3574.8 v1(7212.6,3397.64)
EXT_C.D22: EXTHDR3.46 HDR_T1.45 | length 4560.8
  Top Layer w7.87: EXTHDR3.46@3622.05,3622.05 v1@3622.05,3724.41 ; HDR_T1.45@7181.1,3318.9 v1(7181.1,3421.26)
  MidLayer4 w5: v1(3622.05,3726.38) 3562.99,3785.44 3562.99,3977.33 3628.97,4043.31 3776.55,4043.31 3926.15,3893.7 4590.55,3893.7 7011.81,3893.7 7157.48,3748.03 7157.48,3629.92 7173.23,3614.17 7173.23,3472.44 7181.1,3464.57 v1(7181.1,3421.26)
EXT_C.D23: EXTHDR3.48 HDR_T1.43 | length 4400.5
  Top Layer w7.87: EXTHDR3.48@3653.54,3622.05 v1(3653.54,3700.79) ; HDR_T1.43@7149.61,3318.9 v1(7149.61,3397.64)
  MidLayer2 w5: v1(3653.54,3700.79) 3653.54,3767.72 3582.68,3838.58 3582.68,3956.69 3649.61,4023.62 3870.08,4023.62 4000,3893.7 6830.71,3893.7 7149.61,3574.8 v1(7149.61,3397.64)
EXT_C.D24: EXTHDR3.50 HDR_T1.41 | length 4496.5
  Top Layer w7.87: EXTHDR3.50@3685.04,3622.05 v1(3685.04,3724.41) ; HDR_T1.41@7118.11,3318.9 v1(7118.11,3421.26)
  MidLayer4 w5: v1(3685.04,3724.41) 3574.8,3834.64 3574.8,3972.44 3633.86,4031.5 3771.65,4031.5 3921.26,3881.89 6196.85,3881.89 6960.63,3881.89 7094.49,3748.03 7094.49,3629.92 7110.24,3614.17 7110.24,3472.44 7118.11,3464.57 v1(7118.11,3421.26)
EXT_C.D25: EXTHDR3.52 HDR_T1.39 | length 3939.2
  Top Layer w7.09: HDR_T1.39@7086.61,3318.9 v1(7086.62,3397.64)
  Top Layer w7.87: EXTHDR3.52@3716.54,3622.05 v1(3716.53,3700.79)
  MidLayer2 w5: v1(3716.53,3700.79) 3716.54,3755.91 3842.52,3881.89 6779.53,3881.89 7086.62,3574.8 v1(7086.62,3397.64)
EXT_C.D26: EXTHDR3.54 HDR_T1.37 | length 3935.6
  Top Layer w7.09: HDR_T1.37@7055.12,3318.9 v1(7055.12,3421.26)
  Top Layer w7.87: EXTHDR3.54@3748.03,3622.05 v1(3748.03,3724.41)
  MidLayer4 w5: v1(3748.03,3724.41) 3893.7,3870.08 4459.96,3870.08 6909.45,3870.08 7031.5,3748.03 7031.5,3629.92 7047.25,3614.17 7047.25,3472.44 7055.12,3464.57 v1(7055.12,3421.26)
EXT_C.D27: EXTHDR3.56 HDR_T1.35 | length 3803.5
  Top Layer w7.09: HDR_T1.35@7023.62,3318.9 v1(7023.62,3397.64)
  Top Layer w7.87: EXTHDR3.56@3779.53,3622.05 v1(3779.53,3700.79)
  MidLayer2 w5: v1(3779.53,3700.79) 3779.53,3755.91 3893.7,3870.08 6728.35,3870.08 7023.62,3574.8 v1(7023.62,3397.64)
EXT_C.D28: EXTHDR3.58 HDR_T1.33 | length 3803.8
  Top Layer w7.09: HDR_T1.33@6992.13,3318.9 v1(6992.13,3421.26)
  Top Layer w7.87: EXTHDR3.58@3811.02,3622.05 v1(3811.02,3724.41)
  MidLayer4 w5: v1(3811.02,3724.41) 3944.88,3858.27 6200.79,3858.27 ; 6196.85,3858.27 6200.79,3858.27 ; v1(6992.13,3421.26) 6992.13,3464.57 6984.25,3472.44 6984.25,3614.17 6968.51,3629.92 6968.51,3748.03 6858.27,3858.27 6200.79,3858.27
EXT_C.D29: EXTHDR3.60 HDR_T1.31 | length 3667.7
  Top Layer w7.09: HDR_T1.31@6960.63,3318.9 v1(6960.63,3397.64)
  Top Layer w7.87: EXTHDR3.60@3842.52,3622.05 v1(3842.52,3700.79)
  MidLayer2 w5: v1(3842.52,3700.79) 3842.52,3755.91 3944.88,3858.27 6677.17,3858.27 6960.63,3574.8 v1(6960.63,3397.64)
EXT_C.D30: EXTHDR3.62 HDR_T1.29 | length 3664.1
  Top Layer w7.09: HDR_T1.29@6929.13,3318.9 v1(6929.13,3421.26)
  Top Layer w7.87: EXTHDR3.62@3874.02,3622.05 v1(3874.02,3724.41)
  MidLayer4 w5: v1(3874.02,3724.41) 3996.06,3846.46 4590.55,3846.46 6807.08,3846.46 6905.51,3748.03 6905.51,3629.92 6921.26,3614.17 6921.26,3472.44 6929.14,3464.57 v1(6929.13,3421.26)
EXT_C.D31: EXTHDR3.64 HDR_T1.27 | length 3548.1
  Top Layer w7.09: HDR_T1.27@6897.64,3318.9 v1(6897.64,3397.64)
  Top Layer w7.87: EXTHDR3.64@3905.51,3622.05 v1(3905.51,3700.79)
  MidLayer2 w5: v1(3905.51,3700.79) 3905.51,3755.91 3996.06,3846.46 6653.54,3846.46 6844.95,3655.05 6844.95,3627.57 6897.64,3574.88 v1(6897.64,3397.64)
EXT_C.D32: EXTHDR3.66 HDR_T1.25 | length 3737
  Top Layer w7.09: HDR_T1.25@6866.14,3318.9 v1(6866.14,3421.26)
  Top Layer w7.87: EXTHDR3.66@3937.01,3622.05 v1(3937.01,3724.41)
  MidLayer4 w5: v1(3937.01,3724.41) 4047.24,3834.65 6405.51,3834.65 ; 6196.85,3834.65 6405.51,3834.65 ; v1(6866.14,3421.26) 6866.14,3464.57 6858.27,3472.44 6858.27,3614.17 6842.52,3629.92 6842.52,3748.03 6755.9,3834.65 6405.51,3834.65
EXT_C.D33: EXTHDR3.68 HDR_T1.23 | length 3430.1
  Top Layer w7.09: HDR_T1.23@6834.65,3318.9 v1(6834.65,3397.64)
  Top Layer w7.87: EXTHDR3.68@3966.54,3622.05 v1(3966.54,3700.79)
  MidLayer2 w5: v1@3964.57,3700.79 3964.57,3751.97 4047.25,3834.65 6629.92,3834.65 6782.14,3682.43 6782.14,3627.34 6834.65,3574.83 v1(6834.65,3397.64)
EXT_C.D34: EXTHDR3.70 HDR_T1.21 | length 3440.7
  Top Layer w7.09: HDR_T1.21@6803.15,3318.9 v1(6803.15,3421.26)
  Top Layer w7.87: EXTHDR3.70@4000,3622.05 v1@4000,3728.35
  MidLayer4 w5: v1@4000.98,3729.33 4094.49,3822.84 4590.55,3822.84 ; 4543.31,3822.84 6704.72,3822.84 6779.53,3748.03 6779.53,3629.92 6795.28,3614.17 6795.28,3472.44 6803.15,3464.57 v1(6803.15,3421.26)
  other v1: 4000,3730.32
EXT_C.D35: EXTHDR3.72 HDR_T1.19 | length 3291.9
  Top Layer w7.09: HDR_T1.19@6771.65,3318.9 v1(6771.65,3397.64)
  Top Layer w7.87: EXTHDR3.72@4033.47,3622.05 v1(4033.46,3700.79)
  MidLayer2 w5: v1(4033.46,3700.79) 4033.46,3757.87 4098.43,3822.83 6578.74,3822.84 6718.88,3682.69 6718.88,3627.56 6771.65,3574.79 v1(6771.65,3397.64)
EXT_C.D36: EXTHDR3.74 HDR_T1.17 | length 3563.9
  Top Layer w7.09: HDR_T1.17@6740.16,3318.9 v1(6740.16,3421.26)
  Top Layer w7.87: EXTHDR3.74@4062.99,3622.05 v1(4062.99,3724.41)
  MidLayer4 w5: v1(4062.99,3724.41) 4149.61,3811.02 6503.94,3811.03 ; 6196.85,3811.03 6503.94,3811.03 ; v1(6740.16,3421.26) 6740.16,3464.57 6732.28,3472.44 6732.28,3614.17 6716.54,3629.92 6716.54,3748.03 6653.54,3811.03 6503.94,3811.03
EXT_C.D37: EXTHDR3.76 HDR_T1.15 | length 3156.9
  Top Layer w7.09: HDR_T1.15@6708.66,3318.9 v1(6708.66,3397.64)
  Top Layer w7.87: EXTHDR3.76@4094.49,3622.05 v1(4094.49,3700.79)
  MidLayer2 w5: v1(4094.49,3700.79) 4094.49,3755.91 4149.61,3811.02 6527.56,3811.02 6656.24,3682.35 6656.24,3627.16 6708.66,3574.74 v1(6708.66,3397.64)
EXT_C.D38: EXTHDR3.78 HDR_T1.13 | length 3188
  Top Layer w7.09: HDR_T1.13@6677.16,3318.9 v1(6677.16,3421.26)
  Top Layer w7.87: EXTHDR3.78@4125.98,3622.05 v1(4125.98,3724.41)
  MidLayer4 w5: v1(4125.98,3724.41) 4200.79,3799.21 4590.55,3799.22 ; 4523.62,3799.21 6602.36,3799.21 6657.02,3744.55 6657.02,3626.38 6669.29,3614.11 6669.29,3472.44 6677.17,3464.57 v1(6677.16,3421.26)
EXT_C.D39: EXTHDR3.80 HDR_T1.11 | length 3035.5
  Top Layer w7.87: EXTHDR3.80@4157.48,3622.05 v1(4157.48,3700.79) ; HDR_T1.11@6645.67,3318.9 v1(6645.67,3397.64)
  MidLayer2 w5: v1(4157.48,3700.79) 4157.48,3755.91 4200.79,3799.21 6484.25,3799.21 6633.86,3649.61 6633.86,3625.99 6622.05,3614.17 6622.05,3594.49 6645.67,3570.87 v1(6645.67,3397.64)
EXT_C.D40: EXTHDR3.82 HDR_T1.12 | length 2785.7
  Top Layer w7.87: EXTHDR3.82@4188.98,3622.05 v1(4188.98,3724.41) ; HDR_T1.12@6645.67,3531.5 v1(6645.67,3610.24)
  MidLayer4 w5: v1(4188.98,3724.41) 4251.97,3787.4 6551.18,3787.4 6645.67,3692.91 v1(6645.67,3610.24)
EXT_C.D41: EXTHDR3.84 HDR_T1.9 | length 2916.9
  Top Layer w7.87: EXTHDR3.84@4220.47,3622.05 v1(4220.47,3700.79) ; HDR_T1.9@6614.17,3318.9 v1(6614.17,3421.26)
  MidLayer2 w5: v1(4220.47,3700.79) 4220.47,3755.91 4251.97,3787.4 ; 4251.97,3787.4 6456.69,3787.4 6593.85,3650.24 6593.85,3626.62 6606.3,3614.17 6606.3,3472.44 6614.17,3464.57 v1(6614.17,3421.26)
EXT_C.D42: EXTHDR3.86 HDR_T1.10 | length 2663
  Top Layer w7.87: EXTHDR3.86@4251.97,3622.05 v1(4251.97,3724.41) ; HDR_T1.10@6614.17,3531.5 v1(6614.17,3633.86)
  MidLayer4 w5: v1(4251.97,3724.41) 4303.15,3775.59 6500,3775.59 6614.17,3661.42 v1(6614.17,3633.86)
EXT_C.D43: EXTHDR3.88 HDR_T1.7 | length 2827
  Top Layer w7.87: EXTHDR3.88@4283.47,3622.05 v1(4283.46,3700.79) ; HDR_T1.7@6582.68,3318.9 v1(6582.68,3397.64)
  MidLayer2 w5: v1(4283.46,3700.79) 4283.47,3755.91 4303.15,3775.59 6444.88,3775.59 6570.87,3649.61 6570.87,3625.99 6559.06,3614.17 6559.06,3594.49 6582.68,3570.87 v1(6582.68,3397.64)
EXT_C.D44: EXTHDR3.90 HDR_T1.8 | length 2540.3
  Top Layer w7.87: EXTHDR3.90@4314.96,3622.05 v1(4314.96,3724.41) ; HDR_T1.8@6582.68,3531.5 v1(6582.68,3610.24)
  MidLayer4 w5: v1(4314.96,3724.41) 4354.33,3763.78 6448.82,3763.78 6582.68,3629.92 v1(6582.68,3610.24)
EXT_C.D45: EXTHDR3.92 HDR_T1.5 | length 2710.6
  Top Layer w7.87: EXTHDR3.92@4346.46,3622.05 v1(4346.46,3700.79) ; HDR_T1.5@6551.18,3318.9 v1(6551.18,3421.26)
  MidLayer2 w5: v1(4346.46,3700.79) 4346.46,3755.91 4354.33,3763.78 6421.26,3763.78 6531.5,3653.54 6531.5,3625.98 6543.31,3614.17 6543.31,3472.44 6551.18,3464.57 v1(6551.18,3421.26)
EXT_C.D46: EXTHDR3.94 HDR_T1.6 | length 2438.3
  Top Layer w7.87: EXTHDR3.94@4377.95,3622.05 v1(4377.95,3724.41) ; HDR_T1.6@6551.18,3531.5 v1(6551.18,3633.86)
  MidLayer4 w5: v1(4377.95,3724.41) 4405.51,3751.97 6433.07,3751.97 v1(6551.18,3633.86)
EXT_C.D47: EXTHDR3.96 HDR_T1.3 | length 2604.6
  Top Layer w7.87: EXTHDR3.96@4409.45,3622.05 v1(4409.45,3700.79) ; HDR_T1.3@6519.68,3318.9 v1(6519.69,3397.64)
  MidLayer2 w5: v1(4409.45,3700.79) 4409.45,3732.28 4429.13,3751.97 6405.51,3751.97 6507.87,3649.61 6507.87,3625.99 6496.06,3614.17 6496.06,3594.49 6519.68,3570.87 v1(6519.69,3397.64)
EXT_C.D48: EXTHDR3.98 HDR_T1.4 | length 2336.3
  Top Layer w7.87: EXTHDR3.98@4440.95,3622.05 v1(4440.94,3724.41) ; HDR_T1.4@6519.68,3531.5 v1(6519.68,3610.24)
  MidLayer4 w5: v1(4440.94,3724.41) 4456.69,3740.16 6417.32,3740.16 6519.68,3637.8 v1(6519.68,3610.24)
EXT_C.D49: EXTHDR3.100 HDR_T1.2 | length 2271
  Top Layer w7.87: EXTHDR3.100@4472.44,3622.05 v1(4472.44,3700.79) ; HDR_T1.2@6488.19,3531.5 v1(6488.19,3633.86)
  MidLayer2 w5: v1(4472.44,3700.79) 4472.44,3724.41 4488.19,3740.16 6381.89,3740.16 v1(6488.19,3633.86)
EXTCTRL#.1WIRE: J15.14 R137.1 U5.D13 | length 8938.4
  Top Layer w7.87: v1(9948.82,3838.58) U5.D13@9968.5,3818.9
  Top Layer w30: v4(5505.51,4994.27) v4(5505.51,5039.19)
  MidLayer1 w5: v9(9902,4158.5) 9902,4530 9893,4539 9893,4585 9896.94,4588.94 9929.05,4588.94 9965.7,4552.29 v8(9965.7,4531.1)
  MidLayer1 w30: v4(5505.51,4994.27) v4(5505.51,5039.19)
  MidLayer2 w30: v4(5505.51,4994.27) v4(5505.51,5039.19)
  MidLayer4 w15.75: v2(5331.21,5035.42) 5331.21,5076.81 5348.9,5094.5 5488.1,5094.5 5505.51,5077.09 v4(5505.51,5039.19)
  MidLayer4 w30: v4(5505.51,4994.27) v4(5505.51,5039.19)
  MidLayer3 w5: v4(5505.51,5039.19) 5592.32,5126 6218.8,5126 6769.3,4575.5 6851.31,4575.5 7034.31,4392.5 9292.5,4392.5 9298.5,4398.5 9452.84,4398.5 9460.88,4390.45 10268.05,4390.45 10282.1,4404.5 10392.3,4404.5 10454.3,4342.5 10454.3,4153.3 10466.1,4141.5 10561.5,4141.5 10574.6,4154.6 10574.6,4517.7 10534.37,4557.93 10069.32,4557.93 10042.48,4531.1 v8(9965.7,4531.1) ; v9(9902,4158.5) 9902,4181.4 9892.95,4190.45 9623.73,4190.45 9568.08,4134.8 9549.6,4134.8 9520.3,4105.5 9520.3,4038.97 9617.69,3941.58 9887.54,3941.58 9948.82,3880.3 v1(9948.82,3838.58)
  MidLayer3 w30: v4(5505.51,4994.27) v4(5505.51,5039.19)
  Bottom Layer w15.75: R137.1@5288.89,5035.42 v2(5331.21,5035.42)
  Bottom Layer w50: J15.14@5505.51,4896.09 v4(5505.51,5039.19)
EXTCTRL#.CS1_N: J15.11 R140.1 | length 558.9
  Top Layer w30: v4(5605.51,4538.77) v4(5605.51,4583.68)
  MidLayer1 w30: v4(5605.51,4538.77) v4(5605.51,4583.68)
  MidLayer2 w30: v4(5605.51,4538.77) v4(5605.51,4583.68)
  MidLayer4 w30: v4(5605.51,4538.77) v4(5605.51,4583.68)
  MidLayer3 w30: v4(5605.51,4538.77) v4(5605.51,4583.68)
  Bottom Layer w5: R140.1@5570.46,4419.21 5605.51,4454.26 v4@5605.51,4528.27
  Bottom Layer w50: v4@5605.51,4528.27 J15.11@5605.51,4738.98
EXTCTRL#.CS2_N: J15.12 R138.1 | length 874.8
  Top Layer w30: v4(5605.51,4994.27) v4(5605.51,5039.19)
  MidLayer1 w30: v4(5605.51,4994.27) v4(5605.51,5039.19)
  MidLayer2 w30: v4(5605.51,4994.27) v4(5605.51,5039.19)
  MidLayer4 w30: v4(5605.51,4994.27) v4(5605.51,5039.19)
  MidLayer3 w30: v4(5605.51,4994.27) v4(5605.51,5039.19)
  Bottom Layer w7.87: J15.12@5605.51,4838.98 5653.13,4791.36 R138.1@5653.13,4419.21
  Bottom Layer w50: J15.12@5605.51,4838.98 v4@5605.51,5049.69
EXTCTRL#.DIN1: J15.13 R139.2 | length 798.3
  Top Layer w30: v4(5505.51,4538.77) v4(5505.51,4583.68)
  MidLayer1 w30: v4(5505.51,4538.77) v4(5505.51,4583.68)
  MidLayer2 w30: v4(5505.51,4538.77) v4(5505.51,4583.68)
  MidLayer4 w30: v4(5505.51,4538.77) v4(5505.51,4583.68)
  MidLayer3 w30: v4(5505.51,4538.77) v4(5505.51,4583.68)
  Bottom Layer w5: R139.2@5401.17,4419.21 5505.51,4523.56 J15.13@5505.51,4738.98
  Bottom Layer w50: v4@5505.51,4528.27 J15.13@5505.51,4738.98
EXTCTRL#.DIN2: J15.9 R320.1 | length 1134.9
  Top Layer w30: v4(5705.51,4538.77) v4(5705.51,4583.68)
  MidLayer1 w30: v4(5705.51,4538.77) v4(5705.51,4583.68)
  MidLayer2 w5: v2(5232,4529) 5345,4529 5367,4551 5367,4624 5381,4638 5651.19,4638 v4(5705.51,4583.68)
  MidLayer2 w30: v4(5705.51,4538.77) v4(5705.51,4583.68)
  MidLayer4 w30: v4(5705.51,4538.77) v4(5705.51,4583.68)
  MidLayer3 w30: v4(5705.51,4538.77) v4(5705.51,4583.68)
  Bottom Layer w5: R320.1@5231.88,4419.21 5231.88,4528.88 v2(5232,4529) v2@5237,4532
  Bottom Layer w50: v4@5705.51,4528.27 J15.9@5705.51,4738.98
EXTCTRL#.SCK1: J15.15 R141.2 | length 705.1
  Top Layer w30: v4(5405.51,4538.77) v4(5405.51,4583.68)
  MidLayer1 w30: v4(5405.51,4538.77) v4(5405.51,4583.68)
  MidLayer2 w30: v4(5405.51,4538.77) v4(5405.51,4583.68)
  MidLayer4 w30: v4(5405.51,4538.77) v4(5405.51,4583.68)
  MidLayer3 w30: v4(5405.51,4538.77) v4(5405.51,4583.68)
  Bottom Layer w5: v4@5405.51,4528.27 5405.51,4484.91 5364.3,4443.7 5364.3,4408.8 5375.7,4397.4 5430.8,4397.4 5452.61,4419.21 R141.2@5483.84,4419.21
  Bottom Layer w50: v4@5405.51,4528.27 J15.15@5405.51,4738.98
EXTCTRL#.SCK2: J15.10 R189.1 | length 1352.7
  Top Layer w30: v4(5705.51,4994.27) v4(5705.51,5039.19)
  MidLayer1 w30: v4(5705.51,4994.27) v4(5705.51,5039.19)
  MidLayer2 w5: v2(5314.55,4610.45) 5359.1,4655 5667,4655 5705.51,4693.51 v4(5705.51,4994.27)
  MidLayer2 w30: v4(5705.51,4994.27) v4(5705.51,5039.19)
  MidLayer4 w30: v4(5705.51,4994.27) v4(5705.51,5039.19)
  MidLayer3 w30: v4(5705.51,4994.27) v4(5705.51,5039.19)
  Bottom Layer w5: R189.1@5314.55,4419.21 v2(5314.55,4610.45)
  Bottom Layer w50: J15.10@5705.51,4838.98 v4@5705.51,5049.69
EXTCTRL.CS1_N: R140.2 U5.F19 | length 6133.7
  Top Layer w7.87: U5.F19@10204.72,3740.16 v1(10224.41,3759.84)
  MidLayer4 w5: v1(10224.41,3759.84) 10244.09,3779.53 10244.09,3905.51 10267.72,3929.13 10362.2,3929.13 10409.45,3976.38 10409.45,4165.35 v1(10484.25,4240.16)
  MidLayer3 w7.87: v1(7748.03,4555.12) 7748.03,4523.62 7830.71,4440.94 10015.75,4440.94 10095.55,4520.75 10479.25,4520.75 10507.87,4492.13 10507.87,4263.78 v1(10484.25,4240.16)
  Bottom Layer w7.87: R140.2@5572.04,4376.85 5572.04,4378.43 R140.2@5570.46,4376.85 5570.46,4341.54 5581.29,4330.71 7551.18,4330.71 7748.03,4527.56 v1(7748.03,4555.12)
EXTCTRL.CS2_N: R138.2 U5.F18 | length 6088.1
  Top Layer w7.87: U5.F18@10165.35,3740.16 v1(10185.04,3759.84)
  MidLayer4 w5: v1(10185.04,3759.84) 10204.72,3779.53 10204.72,3909.45 10234.41,3939.13 10358.06,3939.13 10397.64,3978.71 10397.64,4185.04 v1(10484.25,4271.65)
  MidLayer3 w7.87: v1(7724.41,4590.55) 7724.41,4519.69 7818.9,4425.2 10023.62,4425.2 10106.3,4507.87 10452.76,4507.87 10484.25,4476.38 v1(10484.25,4271.65)
  Bottom Layer w7.87: R138.2@5653.13,4376.85 5653.13,4362.61 5669.29,4346.46 7543.31,4346.46 7724.41,4527.56 v1(7724.41,4590.55)
EXTCTRL.DIN1: R139.1 U5.F21 | length 6332.8
  Top Layer w7.87: U5.F21@10283.46,3740.16 v1(10303.15,3759.84)
  MidLayer4 w5: v1(10303.15,3759.84) 10322.83,3779.53 10322.83,3893.7 10334.65,3905.51 10377.95,3905.51 10484.25,4011.81 v1(10484.25,4173.23)
  MidLayer3 w7.87: v1(7795.28,4555.12) 7795.28,4531.5 7854.33,4472.44 10000,4472.44 10074.06,4546.5 10516.5,4546.5 10547.24,4515.75 10547.24,4236.22 v1(10484.25,4173.23)
  Bottom Layer w7.87: R139.1@5401.17,4376.85 5401.17,4327.18 5429.13,4299.21 7566.93,4299.21 7795.28,4527.56 v1(7795.28,4555.12) ; R139.1@5403.54,4376.85 R139.1@5403.54,4378.43
EXTCTRL.DIN2: R320.2 U5.F16 | length 7090.2
  Top Layer w7.87: U5.F16@10086.61,3740.16 v1(10106.3,3759.84)
  MidLayer4 w5: v2(5163,4544) 5203,4544 5228,4569 v2(5228,4969) ; v1(10106.3,3759.84) 10086.6,3779.54 10086.6,3959.2 10109.3,3981.9 10109.3,4001 10128.8,4020.5 10177.5,4020.5 10311,4154 10311,4241 10376,4306 v9@10389,4306
  MidLayer3 w5: v2(5228,4969) 5272,4969 5294,4947 5530.86,4947 5551,4967.14 5551,5051 5616,5116 6214.66,5116 6765.16,4565.5 6847.16,4565.5 7030.16,4382.5 9297.86,4382.5 9303.86,4388.5 9448.7,4388.5 9456.74,4380.45 10230.83,4380.45 10308.28,4303 v9(10401,4303)
  Bottom Layer w5: v2(5163,4544) 5163,4390 5176.15,4376.85 R320.2@5231.88,4376.85
EXTCTRL.SCK1: R141.1 U5.F20 | length 6316.3
  Top Layer w7.87: U5.F20@10244.09,3740.16 v1(10263.78,3759.84)
  MidLayer4 w5: v1(10263.78,3759.84) 10283.46,3779.53 10283.46,3901.57 10299.21,3917.32 10370.08,3917.32 10472.44,4019.68 10472.44,4114.17 10464.57,4122.05 10464.57,4188.98 v1(10484.25,4208.66)
  MidLayer3 w7.87: v1(7771.65,4590.55) 7771.65,4527.56 7842.52,4456.69 10007.87,4456.69 10084.8,4533.62 10501.81,4533.62 10523.62,4511.81 10523.62,4248.03 v1(10484.25,4208.66)
  Bottom Layer w7.87: R141.1@5485.42,4376.85 5485.42,4378.43 R141.1@5483.84,4376.85 5483.84,4330.16 5499.04,4314.96 7559.06,4314.96 7771.65,4527.56 v1(7771.65,4590.55)
EXTCTRL.SCK2: R189.2 U5.F17 | length 6933.6
  Top Layer w7.87: U5.F17@10125.98,3740.16 v1(10145.67,3759.84)
  MidLayer4 w5: v2(5268,4937) 5268,4585 5281,4572 v2(5341,4572) ; v1(10145.67,3759.84) 10126,3779.51 10126,3953 10326,4153 10326,4239 10351,4264 v9@10393,4264
  MidLayer3 w5: v2(5268,4937) 5535,4937 5561,4963 5561,5046.86 5620.14,5106 6210.52,5106 6761.02,4555.5 6843.02,4555.5 7026.02,4372.5 9302,4372.5 9308,4378.5 9444.55,4378.5 9452.6,4370.45 10226.69,4370.45 10334.14,4263 v9(10404,4263)
  Bottom Layer w5: R189.2@5314.55,4376.85 5335.85,4376.85 5341,4382 v2(5341,4572)
FBK: R67.1 R68.2 U12.8 | length 499.6
  Bottom Layer w7.87: R68.2@4090.68,1647.63 4090.32,1647.27 R67.1@4043.68,1647.27 4043.68,1543.45 4098.68,1488.45 4098.68,1358.45 4135.68,1321.45 U12.8@4224.18,1321.45